# Altium PCB PS3604LR.PcbDoc (part 2 of 3)
Units mm, origin at the board's own origin, x right, y up, seen from the top; angles counter-clockwise.
Board outline 116.5 x 26.5 mm, 4 copper layers (Top Layer, inner 1, inner 2, Bottom Layer), stack 1.571 mm thick; 223 components, 126 nets, 609 pads, 259 vias.
Unrouted connection lines stored in the file: 18.
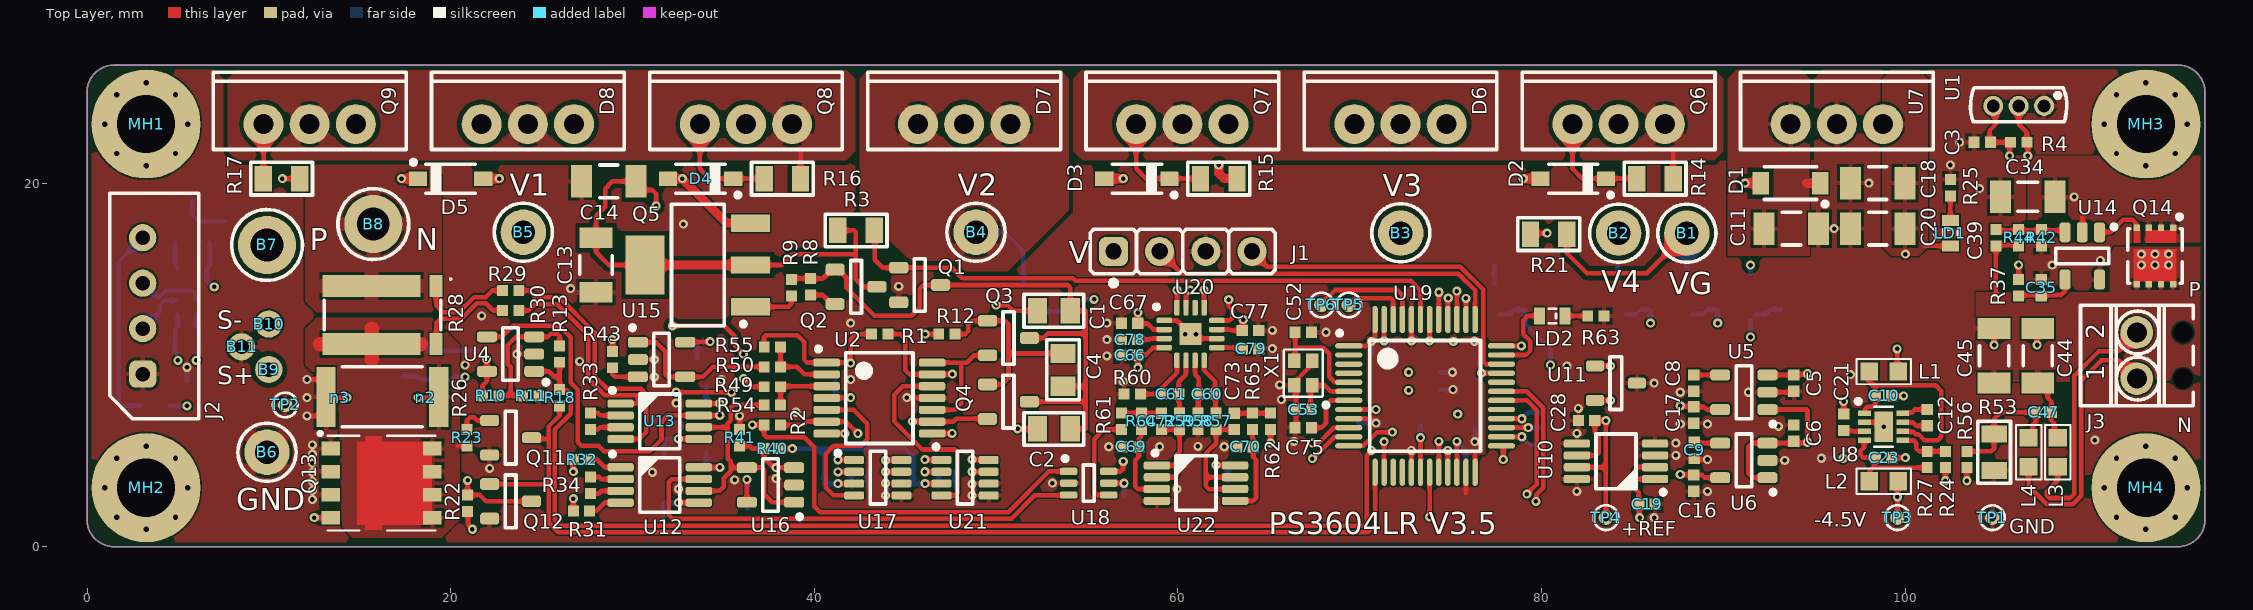
[diagram p0: Top Layer view]

## Part data (continued)
R10 R43: library part R0402_12K_1%_0.0625W_100PPM, "Resistor - 1%", Case=0402, Manufacturer=GENERIC, Manufacturer1 ComponentHeight=0.4mm, Manufacturer1 Example=PHYCOMP, Manufacturer1 Part Number=232270671203, Power=0.0625W, Tolerance=±1%, Author="CERN DEM JLC", Component Type=Standard, CreateDate=12/3/2007, HelpURL=\\cern.ch\dfs\Applications\Altium\Datasheets\R0402_Phycomp_RC0402.pdf, LatestRevisionDate=3/13/2008, Manufacturer Part Number=R0402_12K_1%_0.0625W_100PPM, Mounted=Yes, Part Description="General Purpose Thick Film Chip Resistor", Part Number=R0402_12K_1%_0.0625W_100PPM, Pin Count=2, SMD=Yes, Socket=No, Status="Not recommended", TC=±100ppm/°C
R11: library part R0402_180R_1%_0.0625W_100PPM, "Resistor - 1%", Case=0402, Manufacturer=GENERIC, Manufacturer1 ComponentHeight=0.4mm, Manufacturer1 Example=PHYCOMP, Manufacturer1 Part Number=232270671801, Power=0.0625W, Tolerance=±1%, Author="CERN DEM JLC", Component Type=Standard, CreateDate=12/3/2007, HelpURL=\\cern.ch\dfs\Applications\Altium\Datasheets\R0402_Phycomp_RC0402.pdf, LatestRevisionDate=3/13/2008, Manufacturer Part Number=R0402_180R_1%_0.0625W_100PPM, Mounted=Yes, Part Description="General Purpose Thick Film Chip Resistor", Part Number=R0402_180R_1%_0.0625W_100PPM, Pin Count=2, SMD=Yes, Socket=No, Status="Not recommended", TC=±100ppm/°C
R13: library part R0402_75K_1%_0.0625W_100PPM, "Resistor - 1%", Case=0402, Manufacturer=GENERIC, Manufacturer1 ComponentHeight=0.4mm, Manufacturer1 Example=PHYCOMP, Manufacturer1 Part Number=232270677503, Power=0.0625W, Tolerance=±1%, Author="CERN DEM JLC", Component Type=Standard, CreateDate=12/3/2007, HelpURL=\\cern.ch\dfs\Applications\Altium\Datasheets\R0402_Phycomp_RC0402.pdf, LatestRevisionDate=3/13/2008, Manufacturer Part Number=R0402_75K_1%_0.0625W_100PPM, Mounted=Yes, Part Description="General Purpose Thick Film Chip Resistor", Part Number=R0402_75K_1%_0.0625W_100PPM, Pin Count=2, SMD=Yes, Socket=No, Status="Not recommended", TC=±100ppm/°C
R14 R15 R16 R17: library part R0805_2K2_1%_0.125W_100PPM, "Resistor - 1%", Case=0805, Manufacturer=GENERIC, Manufacturer1 ComponentHeight=0.6mm, Manufacturer1 Example="NIC COMPONENT", Manufacturer1 Part Number=NRC10F2201TRF, Power=0.125W, Tolerance=±1%, Author="CERN DEM JLC", Component Type=Standard, CreateDate=03.12.2007, HelpURL=\\cern.ch\dfs\Applications\Altium\Datasheets\R0805_NIC_NRC.pdf, LatestRevisionDate=13.03.2008, Manufacturer Part Number=R0805_2K2_1%_0.125W_100PPM, Mounted=Yes, Part Description="General Purpose Thick Film Chip Resistor", Part Number=R0805_2K2_1%_0.125W_100PPM, Pin Count=2, SMD=Yes, Socket=No, Status=Preferred, TC=±100ppm/°C
R18 R22 R23: library part R0402_2K_1%_0.0625W_100PPM, "Resistor - 1%", Case=0402, Manufacturer=GENERIC, Manufacturer1 ComponentHeight=0.4mm, Manufacturer1 Example=PHYCOMP, Manufacturer1 Part Number=232270672002, Power=0.0625W, Tolerance=±1%, Author="CERN DEM JLC", Component Type=Standard, CreateDate=12/3/2007, HelpURL=\\cern.ch\dfs\Applications\Altium\Datasheets\R0402_Phycomp_RC0402.pdf, LatestRevisionDate=3/13/2008, Manufacturer Part Number=R0402_2K_1%_0.0625W_100PPM, Mounted=Yes, Part Description="General Purpose Thick Film Chip Resistor", Part Number=R0402_2K_1%_0.0625W_100PPM, Pin Count=2, SMD=Yes, Socket=No, Status="Not recommended", TC=±100ppm/°C
R19: library part R0603_1K_1%_0.1W_100PPM, "Resistor - 1%", Case=0603, Manufacturer=GENERIC, Manufacturer1 ComponentHeight=0.55mm, Manufacturer1 Example="NIC COMPONENT", Manufacturer1 Part Number=NRC06F1001TRF, Power=0.1W, Tolerance=±1%, Author="CERN DEM JLC", Component Type=Standard, CreateDate=12/3/2007, HelpURL=\\cern.ch\dfs\Applications\Altium\Datasheets\R0603_NIC_NRC.pdf, LatestRevisionDate=3/13/2008, Manufacturer Part Number=R0603_1K_1%_0.1W_100PPM, Mounted=Yes, Part Description="General Purpose Thick Film Chip Resistor", Part Number=R0603_1K_1%_0.1W_100PPM, Pin Count=2, SMD=Yes, Socket=No, Status=Preferred, TC=±100ppm/°C
R20: library part R0805_20K_1%_0.125W_100PPM, "Resistor - 1%", Case=0805, Manufacturer=GENERIC, Manufacturer1 ComponentHeight=0.6mm, Manufacturer1 Example="NIC COMPONENT", Manufacturer1 Part Number=NRC10F2002TRF, Power=0.125W, Tolerance=±1%, Author="CERN DEM JLC", Component Type=Standard, CreateDate=12/3/2007, HelpURL=\\cern.ch\dfs\Applications\Altium\Datasheets\R0805_NIC_NRC.pdf, LatestRevisionDate=3/13/2008, Manufacturer Part Number=R0805_20K_1%_0.125W_100PPM, Mounted=Yes, Part Description="General Purpose Thick Film Chip Resistor", Part Number=R0805_20K_1%_0.125W_100PPM, Pin Count=2, SMD=Yes, Socket=No, Status=Preferred, TC=±100ppm/°C
R21: library part R0805_100R_1%_0.125W_100PPM, "Resistor - 1%", Case=0805, Manufacturer=GENERIC, Manufacturer1 ComponentHeight=0.6mm, Manufacturer1 Example="NIC COMPONENT", Manufacturer1 Part Number=NRC10F4700TRF, Power=0.125W, Tolerance=±1%, Author="CERN DEM JLC", Component Type=Standard, CreateDate=12/3/2007, HelpURL=\\cern.ch\dfs\Applications\Altium\Datasheets\R0805_NIC_NRC.pdf, LatestRevisionDate=3/13/2008, Manufacturer Part Number=R0805_100R_1%_0.125W_100PPM, Mounted=Yes, Part Description="General Purpose Thick Film Chip Resistor", Part Number=R0805_100R_1%_0.125W_100PPM, Pin Count=2, SMD=Yes, Socket=No, Status=Preferred, TC=±100ppm/°C
R24: library part R0402_43K_1%_0.0625W_100PPM, "Resistor - 1%", Case=0402, Manufacturer=GENERIC, Manufacturer1 ComponentHeight=0.4mm, Manufacturer1 Example=PHYCOMP, Manufacturer1 Part Number=232270674303, Power=0.0625W, Tolerance=±1%, Author="CERN DEM JLC", Component Type=Standard, CreateDate=12/3/2007, HelpURL=\\cern.ch\dfs\Applications\Altium\Datasheets\R0402_Phycomp_RC0402.pdf, LatestRevisionDate=3/13/2008, Manufacturer Part Number=R0402_43K_1%_0.0625W_100PPM, Mounted=Yes, Part Description="General Purpose Thick Film Chip Resistor", Part Number=R0402_43K_1%_0.0625W_100PPM, Pin Count=2, SMD=Yes, Socket=No, Status="Not recommended", TC=±100ppm/°C
R26: library part R2512_1R0_1%_1W_100PPM, "Resistor - 1%", Case=2512, Manufacturer="KOA SPEER", Manufacturer1 ComponentHeight=0.65mm, Manufacturer1 Part Number=SL1TTE1R00F, Manufacturer Part Number=R2512_1R_1%_1W_100PPM, Power=1W, Tolerance=±1%, Author=DEL, Component Type=Standard, CreateDate=3/21/2025, LatestRevisionDate=3/21/2025, Manufacturer1 Example="KOA SPEER", Mounted=Yes, Part Description="Current Sense Resistors", Part Number=R2512_1R0_1%_1W_100PPM, Pin Count=2, SMD=Yes, Socket=No, Status=Preferred, TC=±100ppm/°C
R27: library part R0402_120K_1%_0.0625W_100PPM, "Resistor - 1%", Case=0402, Manufacturer=GENERIC, Manufacturer1 ComponentHeight=0.4mm, Manufacturer1 Example=PHYCOMP, Manufacturer1 Part Number=232270671204, Power=0.0625W, Tolerance=±1%, Author="CERN DEM JLC", Component Type=Standard, CreateDate=12/3/2007, HelpURL=\\cern.ch\dfs\Applications\Altium\Datasheets\R0402_Phycomp_RC0402.pdf, LatestRevisionDate=3/13/2008, Manufacturer Part Number=R0402_120K_1%_0.0625W_100PPM, Mounted=Yes, Part Description="General Purpose Thick Film Chip Resistor", Part Number=R0402_120K_1%_0.0625W_100PPM, Pin Count=2, SMD=Yes, Socket=No, Status="Not recommended", TC=±100ppm/°C
R28: library part FC4L64R050FER, "Power and Current Sensing Resistor", Case=FC4L64_OHM, Manufacturer=OHM, Power=2W, Tolerance=±1%, Author=DEL, Component Type=Standard, ComponentHeight=0.5mm, CreateDate=3/30/2024, LatestRevisionDate=3/30/2024, Manufacturer Part Number=FC4L64R050FER, Mounted=Yes, Part Description="FC4L Four Terminal Current Sense resistor", Part Number=FC4L64R050FER, Pin Count=4, SMD=Yes, Socket=No, Status=Preferred, TC=±50ppm/°C
R33: library part R0402_680R_0.1%_0.063W_10PPM, "Resistor - 0.1%", Case=0402, Manufacturer=GENERIC, Manufacturer1 ComponentHeight=0.4mm, Manufacturer1 Example=PANASONIC, Manufacturer1 Part Number=ERA-2ARB681X, Manufacturer Part Number=R0402_680R_0.1%_0.0625W_10PPM, Power=0.0625W, Tolerance=±0.1%, Author=DEL, Component Type=Standard, CreateDate=3/21/2025, LatestRevisionDate=3/21/2025, Mounted=Yes, Part Description="General Purpose Thick Film Chip Resistor", Part Number=R0402_680R_0.1%_0.063W_10PPM, Pin Count=2, SMD=Yes, Socket=No, Status="Not recommended", TC=±10ppm/°C
R34: library part R0402_255R_0.1%_0.063W_10PPM, "Resistor - 0.1%", Case=0402, Manufacturer=GENERIC, Manufacturer1 ComponentHeight=0.4mm, Manufacturer1 Example=PANASONIC, Manufacturer1 Part Number=ERA-2ARB2550X, Manufacturer Part Number=R0402_255R_0.1%_0.0625W_10PPM, Power=0.0625W, Tolerance=±0.1%, Author=DEL, Component Type=Standard, CreateDate=3/21/2025, LatestRevisionDate=3/21/2025, Mounted=Yes, Part Description="General Purpose Thick Film Chip Resistor", Part Number=R0402_255R_0.1%_0.063W_10PPM, Pin Count=2, SMD=Yes, Socket=No, Status="Not recommended", TC=±10ppm/°C
R36 R39 R46 R48 R52 R56: library part R0402_4K7_1%_0.0625W_100PPM, "Resistor - 1%", Case=0402, Manufacturer=GENERIC, Manufacturer1 ComponentHeight=0.4mm, Manufacturer1 Example=PHYCOMP, Manufacturer1 Part Number=232270674702, Power=0.0625W, Tolerance=±1%, Author="CERN DEM JLC", Component Type=Standard, CreateDate=12/3/2007, HelpURL=\\cern.ch\dfs\Applications\Altium\Datasheets\R0402_Phycomp_RC0402.pdf, LatestRevisionDate=3/13/2008, Manufacturer Part Number=R0402_4K7_1%_0.0625W_100PPM, Mounted=Yes, Part Description="General Purpose Thick Film Chip Resistor", Part Number=R0402_4K7_1%_0.0625W_100PPM, Pin Count=2, SMD=Yes, Socket=No, Status="Not recommended", TC=±100ppm/°C
R37 R42 R61 R62: library part R0402_10K_1%_0.0625W_100PPM, "Resistor - 1%", Case=0402, Manufacturer=GENERIC, Manufacturer1 ComponentHeight=0.4mm, Manufacturer1 Example=PHYCOMP, Manufacturer1 Part Number=232270671003, Power=0.0625W, Tolerance=±1%, Author="CERN DEM JLC", Component Type=Standard, HelpURL=\\cern.ch\dfs\Applications\Altium\Datasheets\R0402_Phycomp_RC0402.pdf, Manufacturer Part Number=R0402_10K_1%_0.0625W_100PPM, Mounted=Yes, Part Description="General Purpose Thick Film Chip Resistor", Part Number=R0402_10K_1%_0.0625W_100PPM, Pin Count=2, SMD=Yes, Socket=No, Status="Not recommended", TC=±100ppm/°C
  R37 R42: CreateDate=03.12.2007, LatestRevisionDate=13.03.2008
  R61 R62: CreateDate=12/3/2007, LatestRevisionDate=3/13/2008
R40: library part R0402_12K_0.1%_0.063W_10PPM, "Resistor - 0.1%", Case=0402, Manufacturer=GENERIC, Manufacturer1 ComponentHeight=0.4mm, Manufacturer1 Example=PANASONIC, Manufacturer1 Part Number="ERA-2VRB1202X / ERA-2ARB2550X", Manufacturer Part Number=R0402_12K_0.1%_0.0625W_10PPM, Power=0.0625W, Tolerance=±0.1%, Author=DEL, Component Type=Standard, CreateDate=3/21/2025, LatestRevisionDate=3/21/2025, Mounted=Yes, Part Description="General Purpose Thick Film Chip Resistor", Part Number=R0402_12K_0.1%_0.063W_10PPM, Pin Count=2, SMD=Yes, Socket=No, Status="Not recommended", TC=±10ppm/°C
R41: library part R0402_75R_0.1%_0.063W_10PPM, "Resistor - 0.1%", Case=0402, Manufacturer=GENERIC, Manufacturer1 ComponentHeight=0.4mm, Manufacturer1 Example="TE CONNECTIVITY", Manufacturer1 Part Number="RN73C1E75RBTD / ERA-2ARB2550X", Manufacturer Part Number=R0402_75R_0.1%_0.0625W_10PPM, Power=0.0625W, Tolerance=±0.1%, Author=DEL, Component Type=Standard, CreateDate=3/21/2025, LatestRevisionDate=3/21/2025, Mounted=Yes, Part Description="General Purpose Thick Film Chip Resistor", Part Number=R0402_75R_0.1%_0.063W_10PPM, Pin Count=2, SMD=Yes, Socket=No, Status="Not recommended", TC=±10ppm/°C
R49 R50: library part R0402_100K_0.1%_0.063W_10PPM, "Resistor - 0.1%", Case=0402, Manufacturer=GENERIC, Manufacturer1 ComponentHeight=0.4mm, Manufacturer1 Example=VISHAY, Manufacturer1 Part Number=TNPW0402100KBYED, Manufacturer Part Number=R0402_100K_0.1%_0.0625W_10PPM, Power=0.0625W, Tolerance=±0.1%, Author=DEL, Component Type=Standard, CreateDate=3/21/2025, LatestRevisionDate=3/21/2025, Mounted=Yes, Part Description="General Purpose Thick Film Chip Resistor", Part Number=R0402_100K_0.1%_0.063W_10PPM, Pin Count=2, SMD=Yes, Socket=No, Status="Not recommended", TC=±10ppm/°C
R53: library part R0805_1R_1%_0.125W_200PPM, "Resistor - 1%", Case=0805, Manufacturer=GENERIC, Manufacturer1 ComponentHeight=0.65mm, Manufacturer1 Example=PHYCOMP, Manufacturer1 Part Number=232273461008, Power=0.125W, Tolerance=±1%, Author="CERN DEM JLC", Component Type=Standard, CreateDate=12/3/2007, HelpURL=\\cern.ch\dfs\Applications\Altium\Datasheets\R0805_Tyco_RN73.pdf, LatestRevisionDate=6/24/2009, Manufacturer Part Number=R0805_1R_1%_0.125W_200PPM, Mounted=Yes, Part Description="General Purpose Thick Film Chip Resistor", Part Number=R0805_1R_1%_0.125W_200PPM, Pin Count=2, SMD=Yes, Socket=No, Status=Preferred, TC=±200ppm/°C
R54 R55: library part R0402_8K45_0.1%_0.063W_10PPM, "Resistor - 0.1%", Case=0402, Manufacturer=GENERIC, Manufacturer1 ComponentHeight=0.4mm, Manufacturer1 Example=PANASONIC, Manufacturer1 Part Number=ERA-2ARB8451X, Manufacturer Part Number=R0402_8K45_0.1%_0.0625W_10PPM, Power=0.0625W, Tolerance=±0.1%, Author=DEL, Component Type=Standard, CreateDate=3/21/2025, LatestRevisionDate=3/21/2025, Mounted=Yes, Part Description="General Purpose Thick Film Chip Resistor", Part Number=R0402_8K45_0.1%_0.063W_10PPM, Pin Count=2, SMD=Yes, Socket=No, Status="Not recommended", TC=±10ppm/°C
R58 R60: library part R0402_0R_JUMPER, "Resistor - 1%", Case=0402, Manufacturer=GENERIC, Manufacturer1 ComponentHeight=0.4mm, Manufacturer1 Example=PHYCOMP, Manufacturer1 Part Number=232270591001, Author="CERN DEM JLC", Component Type=Standard, CreateDate=12/3/2007, HelpURL=\\cern.ch\dfs\Applications\Altium\Datasheets\R0402_Phycomp_RC0402.pdf, LatestRevisionDate=3/13/2008, Manufacturer Part Number=R0402_0R_JUMPER, Mounted=Yes, Part Description="1A (0.05R Max DC Resistance) Zero Ohm Jumper", Part Number=R0402_0R_JUMPER, Pin Count=2, SMD=Yes, Socket=No, Status="Not recommended"
R64 R65: library part R0402_13K_1%_0.0625W_100PPM, "Resistor - 1%", Case=0402, Manufacturer=GENERIC, Manufacturer1 ComponentHeight=0.4mm, Manufacturer1 Example=PHYCOMP, Manufacturer1 Part Number=232270671303, Power=0.0625W, Tolerance=±1%, Author="CERN DEM JLC", Component Type=Standard, CreateDate=12/3/2007, HelpURL=\\cern.ch\dfs\Applications\Altium\Datasheets\R0402_Phycomp_RC0402.pdf, LatestRevisionDate=3/13/2008, Manufacturer Part Number=R0402_13K_1%_0.0625W_100PPM, Mounted=Yes, Part Description="General Purpose Thick Film Chip Resistor", Part Number=R0402_13K_1%_0.0625W_100PPM, Pin Count=2, SMD=Yes, Socket=No, Status="Not recommended", TC=±100ppm/°C
TP1 TP2 TP3 TP4: library part TP_SMD_0.8MM, "Test Point", Author=DEL, Component Type="Standard (No BOM)", ComponentHeight=0mm, CreateDate=14.11.2017, Family="Test Point", LatestRevisionDate=14.11.2017, Mounted=No, PackageDescription="0.8mm round SMD Pad", Part Description="0.8mm round SMD Pad", Part Number=TP_SMD_0.8MM, Pin Count=1, SMD=No, Socket=No, Status=None
TP5 TP6: library part TP_SMD_0.8MM, Author=DEL, ComponentHeight=0mm, Component Type="Standard (No BOM)", CreateDate=14.11.2017, Family="Test Point", LatestRevisionDate=14.11.2017, Mounted=No, PackageDescription="0.8mm round SMD Pad", Part Description="0.8mm round SMD Pad", Part Number=TP_SMD_0.8MM, Pin Count=1, SMD=No, Socket=No, Status=None
U1: library part DS18B20_h_outside, Case=TO-92, Manufacturer=MAXIM, Author=DEL, ComponentHeight=3.5mm, Component Type=Standard, CreateDate=09.05.2018, Device=DS18B20, LatestRevisionDate=09.05.2018, Manufacturer Part Number=DS18B20, Mounted=Yes, PackageDescription="The TO-92 package HORIZONTAL, OUTSIDE", Part Description="Programmable Resolution 1-Wire Digital Thermometer / 1-Wire Digital Thermometer", Part Number=DS18B20_h_outside, Pin Count=3, SMD=No, Socket=Yes
U2: library part AD8608ARUZ-REEL, "Quad Operational Amplifier", Case=TSSOP14, Manufacturer="ANALOG DEVICES", Author=DEL, ComponentHeight=1.1mm, Component Type=Standard, CreateDate=21.12.2017, Device=AD8608, LatestRevisionDate=21.12.2017, Manufacturer Part Number=AD8608ARUZ-REEL, Mounted=Yes, PackageDescription="SOP, 14-Leads, Body 4.4x5mm (max), Pitch 0.65mm, IPC Medium Density", Part Description="Precision, Low Noise, CMOS, Rail-to-Rail, Input/Output Operational Amplifiers", Part Number=AD8608ARUZ-REEL, Pin Count=14, SMD=Yes, Socket=No
U3: library part NUP4202W1, "ESD Protection Diode, Low  Clamping Voltage", Case=SOT363, Manufacturer="ON SEMICONDUCTOR", Manufacturer Part Number=NUP4202W1T2G, Author=DEL, Component Type=Standard, ComponentHeight=1.1mm, CreateDate=10.11.2017, Device=NUP4202, LatestRevisionDate=10.11.2017, Mounted=Yes, PackageDescription="SOT363, 0.65mm pitch; 6 pin, 1.25mm W X 2mm L, IPC Medium Density", Part Description="ESD Protection Diode, Low  Clamping Voltage", Part Number=NUP4202W1, Pin Count=6, SMD=Yes, Socket=No
U4 U15 U16: library part AD8605ARTZ, "Operational Amplifier", Case=SOT23-5, Manufacturer="ANALOG DEVICES", Manufacturer Part Number=AD8605ARTZ-REEL7, Author=DEL, Component Type=Standard, ComponentHeight=1.45mm, CreateDate=1/7/2025, Device=AD8605, LatestRevisionDate=1/7/2025, Mounted=Yes, PackageDescription="SOT, 0.95mm pitch; 5 pin, 1.60mm W X 2.90mm L X 1.45mm H body, IPC Medium Density", Part Description="Precision, Low Noise, CMOS, Rail-to-Rail, Input/Output Operational Amplifiers", Part Number=AD8605ARTZ, Pin Count=5, SMD=Yes, Socket=No
U5: "150mA Low-Noise Low-Dropout Regulator Whit Shutdown", Case=SOT23-5, Manufacturer="TEXAS INSTRUMENTS", Author="CERN DEM JLC", ComponentHeight=1.45mm, Component Type=Standard, CreateDate=17.03.2011, Device=LP2985A-33DBV, HelpURL=\\cern.ch\dfs\Applications\Altium\Datasheets\LP2985A-33DBV.pdf, LatestRevisionDate=17.03.2011, Manufacturer Part Number=LP2985A-33DBV, Mounted=Yes, PackageDescription="SOT, 0.95mm pitch; 5 pin, 1.60mm W X 2.90mm L X 1.45mm H body, IPC Medium Density", Part Description="3.3V, 150mA Low-Noise Low-Dropout Regulator Whit Shutdown", Part Number=LP2985A-33DBV, Pin Count=5, SMD=Yes, Socket=No
U6: library part LP2985A-50DBVRG4, "150mA Low-Noise Low-Dropout Regulator Whit Shutdown", Case=SOT23-5, Manufacturer="TEXAS INSTRUMENTS", Author=DEL, ComponentHeight=1.45mm, Component Type=Standard, CreateDate=19.12.2017, Device=LP2985A-50DBV, LatestRevisionDate=19.12.2017, Manufacturer Part Number=LP2985A-50DBVRG4, Mounted=Yes, PackageDescription="SOT, 0.95mm pitch; 5 pin, 1.60mm W X 2.90mm L X 1.45mm H body, IPC Medium Density", Part Description="5V, 150mA Low-Noise Low-Dropout Regulator Whit Shutdown", Part Number=LP2985A-50DBV, Pin Count=5, SMD=Yes, Socket=No
U7: library part KIA7812API_h_outside, "3-Terminal Regulator 1=IN 2=GND 3=OUT", Case=TO-220, Manufacturer=KEC, Manufacturer Part Number=KIA7812API, Author=DEL, ComponentHeight=10mm, Component Type=Standard, CreateDate=06.05.2018, Device=KIA7812, LatestRevisionDate=06.05.2018, Mounted=Yes, PackageDescription="TO-220 3-Terminal  Horizontal Outside Mount", Part Description="3-Terminal 12V 1A Positive Voltage Regulator", Part Number=KIA7812API_h_outside, Pin Count=3, SMD=No, Socket=No
U8: "LM27761 Low-Noise, Regulated, Switched-Capacitor Voltage Inverter", Case=WSON, Manufacturer="TEXAS INSTRUMENTS", Manufacturer Part Number=LM27761DSGR, Author=DEL, Component Type=Standard, ComponentHeight=0.8mm, CreateDate=1/19/2025, Device=LM27761, LatestRevisionDate=1/19/2025, Mounted=Yes, PackageDescription="SON, 0.5mm,pitch; 8 pin, 2.00mm W X 2.00mm L X 0.80mm H body", Part Description="LM27761 Low-Noise, Regulated, Switched-Capacitor Voltage Inverter", Part Number=LM27761, Pin Count=6, SMD=Yes, Socket=No
U9 U11: library part TMP236A2DBZR, "Low-Power, High-Accuracy Analog Output Temperature Sensors", Case=SOT23, Manufacturer="TEXAS INSTRUMENTS", Author=DEL, Component Type=Standard, ComponentHeight=1.1mm, CreateDate=12/11/2024, Device=TMP236, LatestRevisionDate=12/11/2024, Manufacturer Part Number=TMP236A2DBZR, Mounted=Yes, PackageDescription="SOT23, 3 pin, Pitch 0.95mm - 1.3mm W X 2.9mm L X 1.1mm H, IPC Medium Density", Part Description="Low-Power, High-Accuracy Analog Output Temperature Sensors", Part Number=TMP236A2DBZR, Pin Count=3, SMD=Yes, Socket=No
U10: Case=MSOP8, Manufacturer="LINEAR TECHNOLOGY", Manufacturer Part Number=LTC3810EUH-5#PBF, Author=DEL, Component Type=Standard, ComponentHeight=1.1mm, CreateDate=1/23/2025, Device=LTC6655BHMS8-3.3, LatestRevisionDate=1/23/2025, Mounted=Yes, PackageDescription="SOP, 0.65mm pitch; 8 pin,3.00mm W X 3.00mm L X 1.10mm H body, IPC Medium Density", Part Description="0.25ppm Noise, Low Drift Precision References", Part Number=LTC6655BHMS8-3.3, Pin Count=33, SMD=Yes, Socket=No
U12 U13: library part AD8421BRMZ-R, "3 nV/√Hz, Low Power Instrumentation Amplifier", Case=MSOP8, Manufacturer="ANALOG DEVICES", Author=DEL, Component Type=Standard, ComponentHeight=1.1mm, CreateDate=1/7/2025, Device=AD8421, LatestRevisionDate=1/7/2025, Manufacturer Part Number=AD8421BRMZ-R, Mounted=Yes, PackageDescription="SOP, 0.65mm pitch; 8 pin, 3.00mm W X 3.00mm L X 1.10mm H body, IPC Medium Density", Part Description="3 nV/√Hz, Low Power Instrumentation Amplifier", Part Number=AD8421BRMZ-R, Pin Count=8, SMD=Yes, Socket=No
U14: library part LMC7101AIM5X/NOPB, "Operational Amplifier", Case=SOT23-5, Manufacturer="TEXAS INSTRUMENTS", Author=DEL, ComponentHeight=1.45mm, Component Type=Standard, CreateDate=29.01.2018, Device=LMC7101, LatestRevisionDate=29.01.2018, Manufacturer Part Number=LMC7101AIM5X/NOPB, Mounted=Yes, PackageDescription="SOT, 0.95mm pitch; 5 pin, 1.60mm W X 2.90mm L X 1.45mm H body, IPC Medium Density", Part Description="2.7-15V, Rail-to-Rail I/O Amplifier", Part Number=LMC7101AIM5X/NOPB, Pin Count=5, SMD=Yes, Socket=No
U17 U21: library part AD5060BRJZ, Case=SOT23-8, Manufacturer="ANALOG DEVICES", Author=DEL, Component Type=Standard, ComponentHeight=1.45mm, CreateDate=10/8/2025, Device=AD5060, LatestRevisionDate=10/8/2025, Manufacturer Part Number=AD5060BRJZ, Mounted=Yes, PackageDescription="SOT, 0.65mm pitch; 8 pin, 1.625mm W X 2.90mm L X 1.45mm H body, IPC Medium Density", Part Description="Fully Accurate 16-Bit VOUT DAC, SPI Interface 2.7 V to 5.5 V, in an SOT-23", Part Number=AD5060BRJZ, Pin Count=8, SMD=Yes, Socket=No
U18: library part TS5A3159DCKR, "1-Ω SPDT Analog Switch", Case=SC70-6, Manufacturer="TEXAS INSTRUMENTS", Manufacturer Part Number=ADS1271IBPW, Author=DEL, Component Type=Standard, ComponentHeight=1.1mm, CreateDate=6/20/2022, Device=TS5A3159, LatestRevisionDate=6/20/2022, Mounted=Yes, PackageDescription="SC70-6, SOT, 0.65mm Pitch, 6 pin", Part Description="1-Ω SPDT Analog Switch", Part Number=TS5A3159DCKR, Pin Count=6, SMD=Yes, Socket=No
U19: "ARM®Cortex®-M4 32b MCU+FPU, up to 256KB Flash+32KB SRAM, timers, 4 ADCs (16-bit Sig. Delta / 12-bit SAR), 3 DACs, 2 comp., 2.0-3.6 V", Case=LQFP48, Manufacturer="ST Microelectronics", Author=D_EL, ComponentHeight=1.6, Component Type=Standard, CreateDate=21.04.2017, Device=STM32F373CCT6, LatestRevisionDate=21.04.2017, Manufacturer Part Number=STM32F373CCT6, Mounted=Yes, PackageDescription="Thin QFP, 48-Leads, Body 7x7mm, Pitch 0.5mm, IPC Medium Density", Part Description="ARM®Cortex®-M4 32b MCU+FPU, up to 256KB Flash+32KB SRAM, timers, 4 ADCs (16-bit Sig. Delta / 12-bit SAR), 3 DACs, 2 comp., 2.0-3.6 V", Part Number=STM32F373CCT6, Pin Count=48, SMD=Yes, Socket=No
U20: "Differential Inputs, 1 MSPS/500 kSPS, Dual Simultaneous Sampling SAR ADCs", Case=LFCSP-16, Manufacturer="ANALOG DEVICES", Manufacturer Part Number=AD4680BCPZ-RL7, Author=DEL, Component Type=Standard, ComponentHeight=0.8mm, CreateDate=1/7/2025, Device=AD4680, LatestRevisionDate=1/7/2025, Mounted=Yes, PackageDescription="QFN,0.50mm pitch,square; 4 pin X 4 pin, 3mm X 3mm X 0.80mm H body (w/thermal tab 1.2 X 1.2mm),  IPC Medium Density", Part Description="Differential Inputs, 1 MSPS/500 kSPS, Dual Simultaneous Sampling SAR ADCs", Part Number=AD4680, Pin Count=16, SMD=Yes, Socket=No
U22: library part AD8606ARMZ-REEL, "Dual Operational Amplifier", Case=MSOP8, Manufacturer="ANALOG DEVICES", Author=DEL, Component Type=Standard, ComponentHeight=1.1mm, CreateDate=07.12.2016, Device=AD8606, LatestRevisionDate=21.12.2017, Manufacturer Part Number=AD8606ARMZ-REEL, Mounted=Yes, PackageDescription="SOP, 0.65mm pitch; 8 pin, 3.00mm W X 3.00mm L X 1.10mm H body, IPC Medium Density", Part Description="Precision, Low Noise, CMOS, Rail-to-Rail, Input/Output Operational Amplifiers", Part Number=AD8606ARMZ-REEL, Pin Count=8, SMD=Yes, Socket=No
X1: library part 24MHZ_XRCGB24M000F3M00R0, "Crystal 4 pins 1=XTAL 2=GND3=XTAL 4=GND", Manufacturer=MURATA, Manufacturer Part Number=7XRCGB24M000F3M00R0, Author=D_EL, ComponentHeight=0.7mm, Component Type=Standard, CreateDate=17.06.2017, LatestRevisionDate=17.06.2017, Mounted=Yes, PackageDescription="Oscillator, corner concave; 4 pin, 2.00mm L X 1.60mm W X 0.65mm H, IPC Medium Density", Part Description="± 30ppm at (25±3°C), -30°C to +85°C, 6pF, Ceramic SMD Crystal, Type HCR2016", Part Number=24MHZ_XRCGB24M000F3M00R0, Pin Count=4, SMD=Yes, Socket=No

## Via types
v1: diameter 0.5, hole 0.25, Top Layer to Bottom Layer, tented both sides, 218 vias
v2: diameter 1, hole 0.3, Top Layer to Bottom Layer, 32 vias
v3: diameter 0.5, hole 0.25, Top Layer to Bottom Layer, tented bottom, 6 vias
v4: diameter 0.5, hole 0.4, Top Layer to Bottom Layer, tented both sides, 3 vias

## Nets (pads, with @x,y where several pads share a name; then routed paths per layer and width w, separated by ;. In a path a pad name is that pad's centre, name@x,y a point inside that pad or via, vN(x,y) a via of type N, cw(c..) or ccw(c..) an arc to the next point about the centre after c; other vN are vias at no path point)
0.0725V: R10.1 R11.2 R13.1 U4.3 | length 7.9
  Top Layer w0.25: R10.1@22.65,8.3 23.3,8.3 ; R11.2@23.95,8.3 23.3,8.3 ; R13.1@26,11.05 26,11.579 25.854,11.725 25.525,11.725 25.35,11.55 U4.3@24.6,11.55 23.6,11.55 23.15,11.1 23.15,10.044 23.3,9.894 23.3,8.3